# Altium PCB PCB1.pcbdoc
Units mil, origin at the board's own origin, x right, y up, seen from the top; angles counter-clockwise.
Board outline 5670 x 5350 mil, 2 copper layers (Top Layer, Bottom Layer); 20 components, 23 nets, 77 pads, 0 vias.
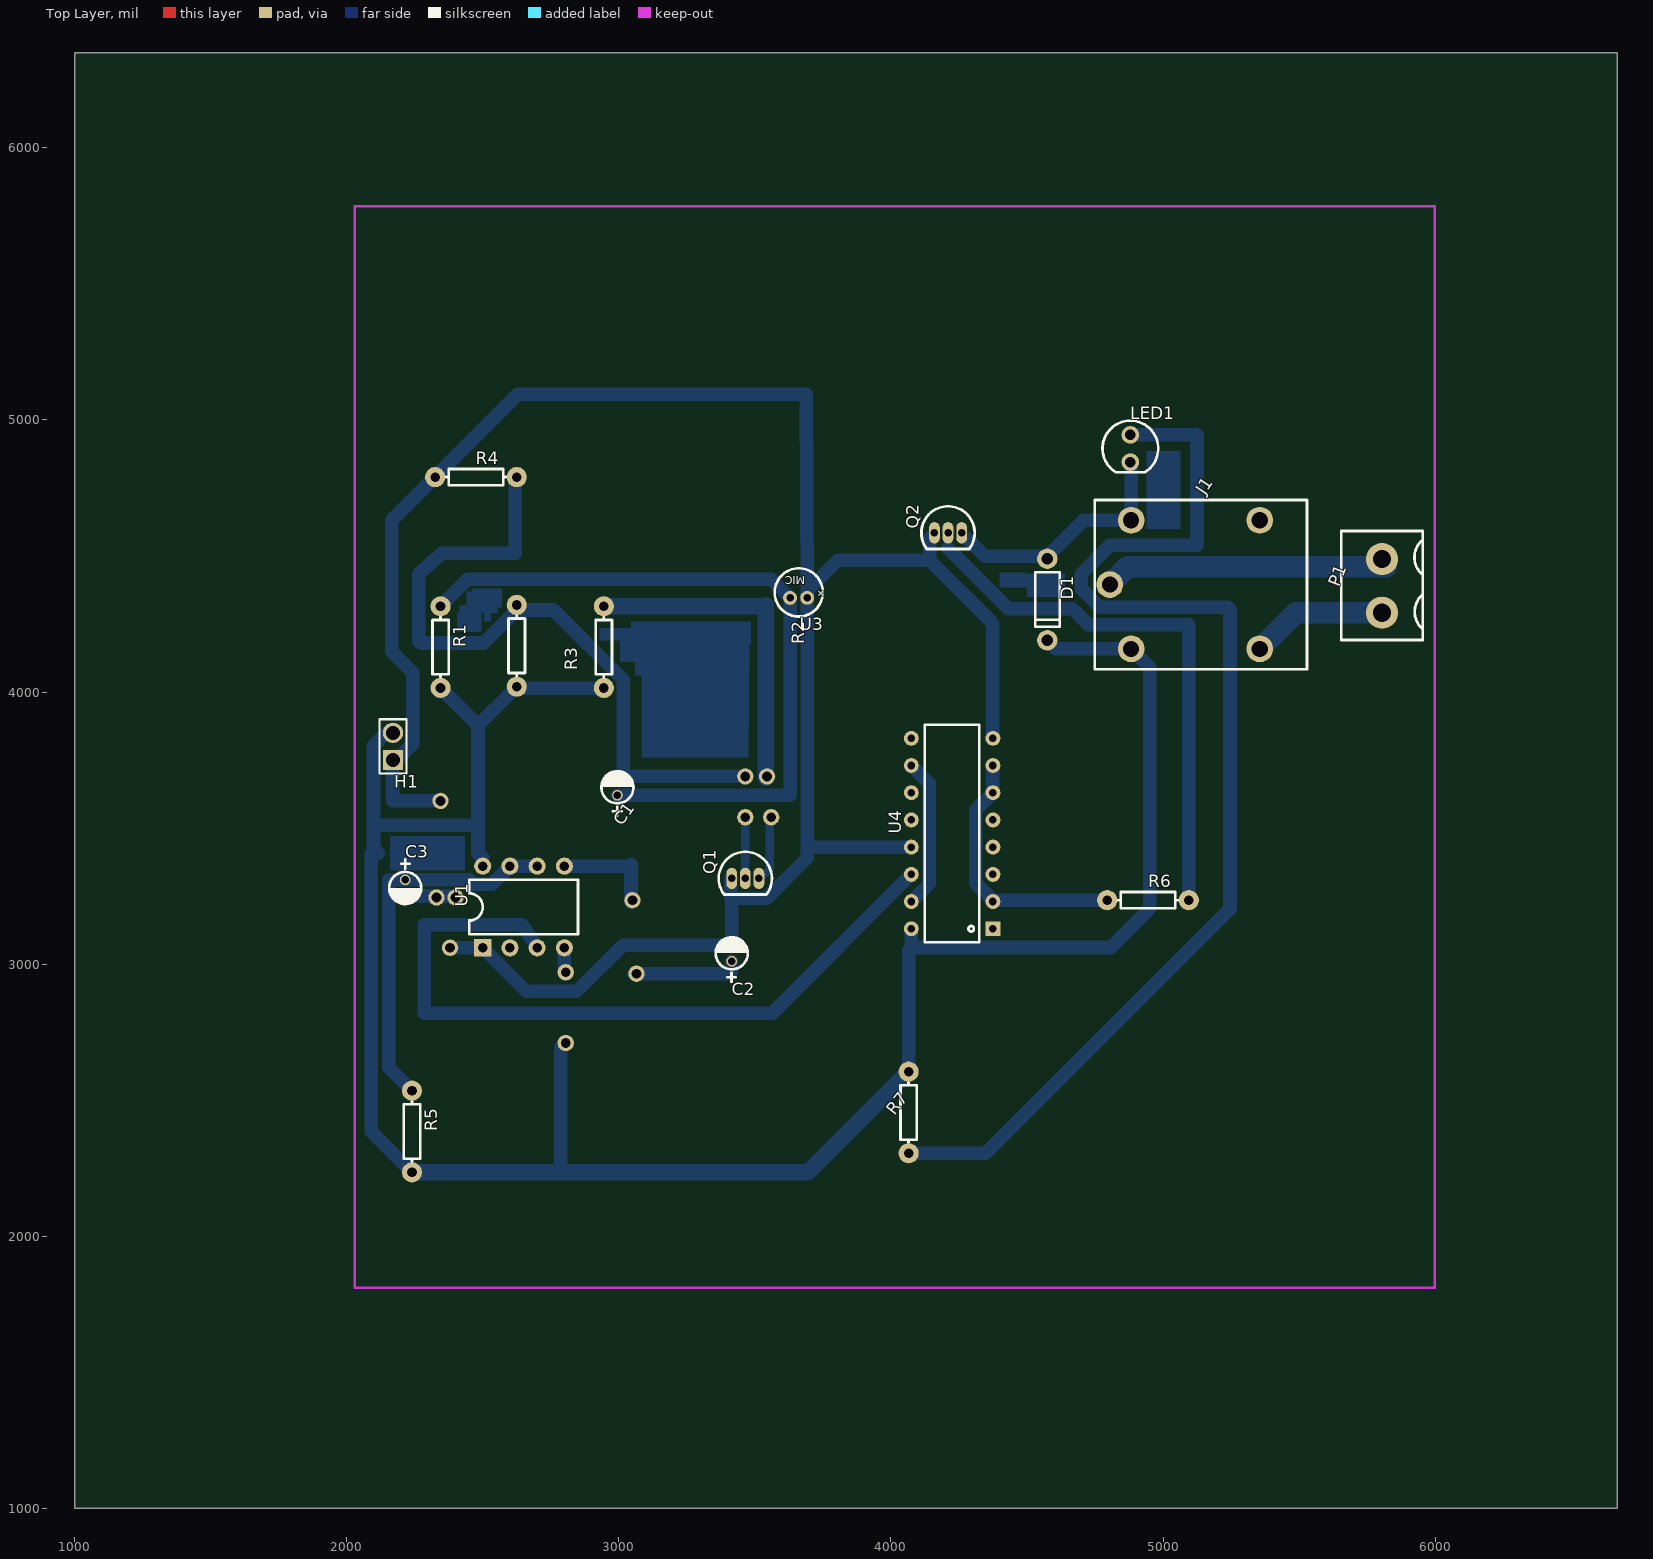
[diagram p0: Top Layer view]
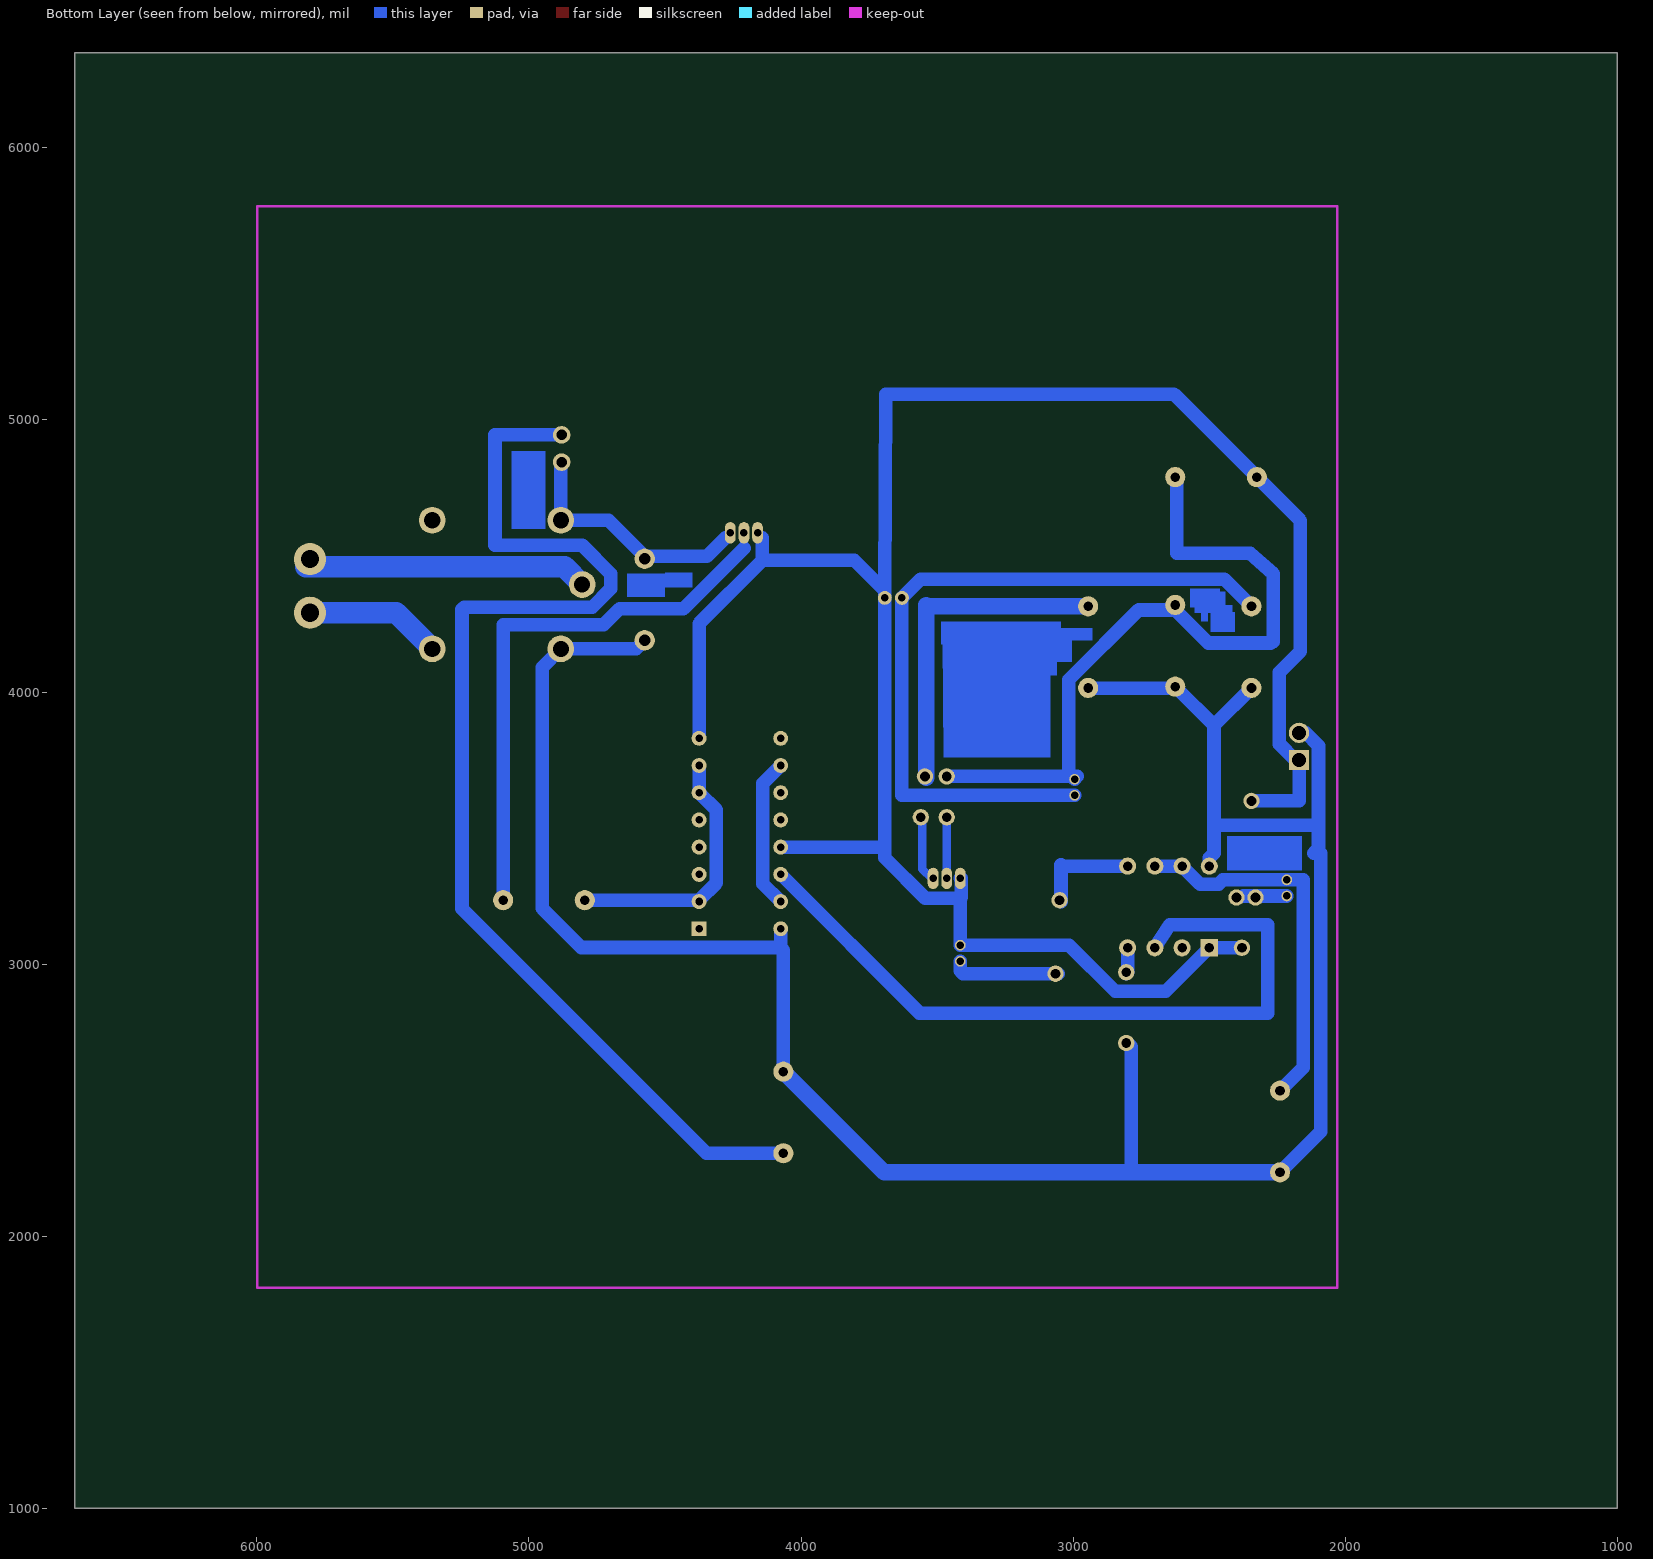
[diagram p1: Bottom Layer view, seen from below]

## Layer stack, top to bottom
Top Solder: solder mask 0.4, Solder Resist, Dk 3.5
Top Layer: signal copper 1.4
Dielectric1: dielectric 12.6, FR-4, Dk 4.8
Bottom Layer: signal copper 1.4
Bottom Solder: solder mask 0.4, Solder Resist, Dk 3.5

## Board outline
6670,1000 1000,1000 1000,6350 6670,6350

## Design rules (kind name [scope] priority, off if disabled: settings)
Clearance [All] p1: gap=10 ignorepadtopadclearanceinfootprint=FALSE
PolygonConnect [All] p1: connectstyle=Relief reliefconductorwidth=10 reliefentries=4 polygonreliefangle="90 Angle" airgapwidth=10
RoutingVias [All] p1: holewidth=28 width=50 viastyle="Through Hole" minholewidth=28 minwidth=50 maxholewidth=28 maxwidth=50
SolderMaskExpansion [All] p1: expansion=0 istentingtop=FALSE
Width [All] p1: maxlimit=10 minlimit=10 preferedwidth=10
30 further rules are at their usual default settings.

## Components (designator, comment, footprint, x,y, rotation, side; value= is the part's Value field where it differs from the comment)
C1 "1u" CAP-D3.0XF1.5 2995,3650 r180 top
C2 "0.1uf" CAP-D3.0XF1.5 3415,3040 r180 top
C3 "35v 4.7uf" CAP-D3.0XF1.5 2215,3280 r0 top
D1 "1N4448" DO-35 4575,4340 r270 top
H1 "Header-Male-2.54_1x2" HDR-2X1/2.54 2170,3800 r180 top
J1 "RelayHT3F-12VDC-SHG" HT3F-12VDC-SHG 5080,4395 r0 top
LED1 "LED-5MM" LED-5MM/2.54 4880,4895 r0 top
P1 "WJ2EDGVC-5.08-2P" WJ2EDGVC-5.08-2P 5805,4390 r90 top
Q1 "BC547" TO-92(TO-92-3) 3465,3315 r90 top
Q2 "BC547" TO-92(TO-92-3) 4210,4585 r90 top
R1 "18k" AXIAL-0.3 2345,4165 r270 top
R2 "33k" AXIAL-0.3 2625,4170 r270 top
R3 "100ohm" AXIAL-0.3 2945,4165 r270 top
R4 "4.6k" AXIAL-0.3 2475,4790 r0 top
R5 "18k" AXIAL-0.3 2240,2385 r270 top
R6 "18k" AXIAL-0.3 4945,3235 r0 top
R7 "560ohm" AXIAL-0.3 4065,2455 r90 top
U1 "NE555P" DIP-8 2650,3210 r90 top
U3 "MICROPHONE" "MICROPHONE 4.5*2" 3655,4415 r180 top
U4 "4017" DIP16 4225,3480 r90 top

## Footprints (in the part's own frame and the unit in brackets; to place one, negate y for a bottom-side part, rotate by r counter-clockwise, add the part's x,y. Pads: shape width x height; smd on the part's side, far side on the other; paste and mask are expansions set on the pad)
AXIAL-0.3 [mil]
  round 74 hole 35.4 paste-99999 mask+4: 1(-150,0) 2(150,0)
  silkscreen extent -110,-30 110,30
CAP-D3.0XF1.5 [mm]
  round 1 hole 0.7 paste-2539.97 mask+0.102: 1(0,0.751) 2(0,-0.751)
  silkscreen extent -1.5,-1.5 1.5,2.65
DIP16 [mil]
  rect 55x55 hole 28 paste-99999 mask+4: 1(-350,-150)
  round 55 hole 28 paste-99999 mask+4: 2(-250,-150) 3(-150,-150) 4(-50,-150) 5(50,-150) 6(150,-150) 7(250,-150) 8(350,-150) 9(350,150) 10(250,150) 11(150,150) 12(50,150) 13(-50,150) 14(-150,150) 15(-250,150) 16(-350,150)
  silkscreen extent -400,-100 400,100
DIP-8 [mil]
  rect 63x63 hole 35 paste-99999 mask+4: 1(-150,150)
  round 63 hole 35 paste-99999 mask+4: 2(-150,50) 3(-150,-50) 4(-150,-150) 5(150,-150) 6(150,-50) 7(150,50) 8(150,150)
  silkscreen extent -100,-200 100,200
DO-35 [mil]
  round 75 hole 43.31 paste-99999 mask+4: 1(-150,0) 2(150,0)
  silkscreen extent -100,-45 100,45
HDR-2X1/2.54 [mm]
  rect 1.9x1.9 hole 1.3 paste-2539.97 mask+0.102: 1(0,1.27)
  round 1.9 hole 1.3 paste-2539.97 mask+0.102: 2(0,-1.27)
  silkscreen extent -1.27,-2.54 1.27,2.54
HT3F-12VDC-SHG [mm]
  round 2.5 hole 1.5 paste-2539.97 mask+0.102: 1(-6.999,0) 2(-5,-5.999) 3(6.999,-5.999) 4(6.999,5.999) 5(-5,5.999)
  silkscreen extent -8.4,-7.9 11.4,7.9
LED-5MM/2.54 [mil]
  round 65 hole 38 paste-99999 mask+4: 1(0,50) 2(0,-50)
  silkscreen extent -102,-88 102,102
"MICROPHONE 4.5*2" [mm]
  round 1.3 hole 0.7 paste-2539.97 mask+0.102: 1(0.65,1.75) 2(-0.95,1.748)
  silkscreen extent -2.41,-1.01 2.09,3.49
TO-92(TO-92-3) [mm]
  oval 2x1 hole 0.7 paste-2539.97 mask+0.102: 1(0,1.27) 2(0,0) 3(0,-1.27)
  silkscreen extent -1.5,-2.48 2.48,2.48
WJ2EDGVC-5.08-2P [mm]
  round 3 hole 1.7 paste-2539.97 mask+0.102: 1(-2.499,0) 2(2.499,0)
  silkscreen extent -5.04,-3.81 5.12,3.81

## Free pads (board coordinates)
  round 60 hole 36 paste-99999 mask+2: 3(2805,2710) 5(2805,2970) 6(2400,3245) 7(2380,3060) 8(2330,3245) 9(2345,3600) 10(3465,3690) 11(3465,3540) 12(3545,3690) 13(3560,3540) 14(3065,2965) 15(3050,3235)

## Nets (pads, with @x,y where several pads share a name; then routed paths per layer and width w, separated by ;. In a path a pad name is that pad's centre, name@x,y a point inside that pad or via, vN(x,y) a via of type N, cw(c..) or ccw(c..) an arc to the next point about the centre after c; other vN are vias at no path point)
GND: C2.2 C3.2 H1.1 Q1.1 Q2.1 R4.1 U1.1 U3.2 U4.8 U4.13 | length 8385.6
  Bottom Layer w30: Q2.1@4142.1,4566.8 4160,4584.7 Q2.1
  Bottom Layer w50: C3.2 2374.55,3250.45 2400,3245 ; 2345,3600 2170,3600 H1.1 2183.6,3750 2242.3,3808.7 2242.3,4072.7 2165,4150 2165,4630 R4.1 2630,5095 3688.9,5095 3692.4,4371.8 ; 2375,3060 U1.1 2660,2900 2845.9,2900 3015.4,3069.5 3415,3069.5 3415,3241.5 ; Q1.1 3411.2,3315 3411.2,3245.3 3415,3241.5 ; U4.13 3692.4,3430 ; Q2.1@4142.1,4566.8 4142.1,4484.4 ; U4.8 4375,4251.5 4142.1,4484.4 ; 3415,3241.5 3543.1,3241.5 3692.4,3390.8 3692.4,3430 ; 3692.4,3430 U3.2 3692.4,4371.8 ; 3692.4,4371.8 3805.1,4484.4 4142.1,4484.4
J1_1: J1.1 P1.2 | length 1070.8
  Bottom Layer w80: J1.1@4804.5,4395 4869.5,4460 5820,4460 P1.2@5820,4488.4
J1_3: J1.3 P1.1 | length 519.4
  Bottom Layer w80: J1.3 5488.4,4291.6 P1.1@5820,4291.6
J1_4: J1.4
LED1_1: LED1.1 R7.1 | length 4405.3
  Bottom Layer w50: R7.1 4347.7,2305 5246.1,3203.4 5246.1,4303.9 5238.6,4311.4 4767.7,4311.4 4700,4379.2 4700,4435 4805,4540 5125,4540 5125,4945 LED1.1
NETNAME: U1.3 U4.14 | length 2787.5
  Bottom Layer w50: U1.3 2645,3145 2285,3145 2285,2820 3565.1,2820 U4.14
Q2_3: D1.1 J1.5 LED1.2 Q2.3 | length 937.6
  Bottom Layer w30: Q2.3 Q2.3@4277.9,4567.1
  Bottom Layer w50: Q2.3@4277.9,4567.1 4346.7,4498.3 D1.1@4575,4498.3 ; D1.1 D1.1@4575,4498.3 ; LED1.2 4883.2,4841.8 J1.5 4707.9,4631.2 D1.1@4575,4498.3
R1_1: C1.1 R1.1 U3.1 | length 2715.6
  Bottom Layer w50: R1.1 2445,4415 3560.5,4415 U3.1 ; C1.1 3209.55,3620.45 3210,3620 3630,3620 U3.1@3630,4346.1
R2_1: C1.2 Q1.2 R2.1 R4.2 | length 2948.5
  Bottom Layer w30: Q1.2 3465,3550
  Bottom Layer w50: R2.1 R2.1@2625,4301.4 ; R4.2 2620,4790 2620,4510 2350,4510 2265,4435 2265,4184.7 2275,4180 2503.6,4180 R2.1@2625,4301.4 ; C1.2@2995,3679.5 3016.3,3700.8 3016.3,4044.7 2759.6,4301.4 R2.1@2625,4301.4 ; C1.2 2985.7,3690 3465,3690
R3_1: Q1.3 R3.1 U1.2 | length 1476.6
  Bottom Layer w30: Q1.3 3520,3315 3555,3350 3555,3540
  Bottom Layer w60: R3.1 3535,4315 3540,4320 3540,3685
R6_1: R6.1 U4.2 U4.6 U4.7 | length 972.7
  Bottom Layer w50: U4.2 U4.2@4375,3235 ; U4.7 U4.6 4311.4,3566.4 4311.4,3298.6 U4.2@4375,3235 ; R6.1 U4.2@4375,3235
R6_2: Q2.2 R6.2 | length 2070
  Bottom Layer w30: 4210,4528.8 Q2.2
  Bottom Layer w50: 4210,4528.8 4432.6,4306.2 4667.1,4306.2 4726.2,4247.1 5095,4247.1 R6.2
U1_5: C2.1 U1.5 | length 781.7
  Bottom Layer w50: U1.5 3040,3360 3045,3365 3045,3230 ; 3055,2965 3405,2965 3415,2975 C2.1
U1_6: C3.1 R5.1 U1.6 U1.7 | length 1388.7
  Bottom Layer w50: R5.1 2155,2620 2155,3309.55 C3.1 2450.05,3309.55 2465.8,3293.8 2533.8,3293.8 U1.7 U1.6
U4_1: U4.1
U4_3: U4.3
U4_4: U4.4
U4_5: U4.5
U4_9: U4.9
U4_10: U4.10 U4.15 | length 554.4
  Bottom Layer w50: U4.15 4140.7,3295.7 4140.7,3664.3 U4.10
U4_11: U4.11
U4_12: U4.12
VCC: D1.2 H1.2 J1.2 R1.2 R2.2 R3.2 R5.2 R7.2 U1.4 U1.8 U4.16 | length 8690
  Bottom Layer w50: 2115,3510 2481.3,3510 ; H1.2 2145.8,3850 2098.5,3802.7 2098.5,3425.7 2116.2,3408 2090,3408 2090,2385 R5.2 ; R1.2 2482.5,3877.5 ; U1.8 2500,3390.5 2482.5,3408 2482.5,3877.5 ; R2.2 R2.2@2625,4014.2 ; 2786.13,2235 2786.13,2696.13 2800,2710 ; U1.4 2800,2970 2805,2965 ; R3.2 2944.3,4014.2 2866.7,4014.2 R2.2@2625,4014.2 ; R7.2 4065,3051.3 4075,3061.3 ; U4.16 4075,3061.3 ; D1.2 4606.2,4158.8 J1.2 4951.7,4090.3 4951.7,3204.9 4808,3061.3 4075,3061.3 ; 2482.5,3877.5 2619.3,4014.2 R2.2@2625,4014.2
  Bottom Layer w60: R5.2 3695,2235 R7.2

## Other copper
Bottom Layer:
  rectangle: 3045,4175 3485,4260
  rectangle: 2930,4190 3070,4235
  rectangle: 3020,4170 3025,4175
  rectangle: 3005,4110 3075,4200
  rectangle: 3060,4060 3105,4190
  rectangle: 2475,4230 2485,4380
  rectangle: 2440,4220 2470,4370
  rectangle: 2460,4220 2495,4365
  rectangle: 2480,4290 2555,4365
  rectangle: 2505,4260 2530,4290
  rectangle: 2460,4310 2570,4380
  rectangle: 2405,4220 2445,4295
  rectangle: 2415,4290 2450,4320
  rectangle: 2160,3345 2435,3470
  rectangle: 4400,4385 4500,4440
  rectangle: 4500,4350 4640,4435
  rectangle: 4940,4600 5065,4885
  region: 3085,4195 3085,3760 3475,3760 3480,4195

## Silkscreen, mask and mechanical layers (free items; w line width, h text height)
Document:
  lines w0.1: 3834.99,3674.99 3835.01,3675.01

## Text inside footprints (layer, text, board x,y; h text height)
U3: Top Overlay "+" at 3721.36,4365.46 h29.53 r315; Top Overlay "MIC" at 3685.7,4425.36 h29.53 r180